# Altium PCB Tony_Tablet.PcbDoc (part 5 of 5)
Units mm, origin at the board's own origin, x right, y up, seen from the top; angles counter-clockwise.
Board outline 136.83 x 90.55 mm, 4 copper layers (Top Layer, Power, GND, Bottom Layer), stack 0.778 mm thick; 275 components, 264 nets, 1226 pads, 0 vias.
Unrouted connection lines stored in the file: 716.
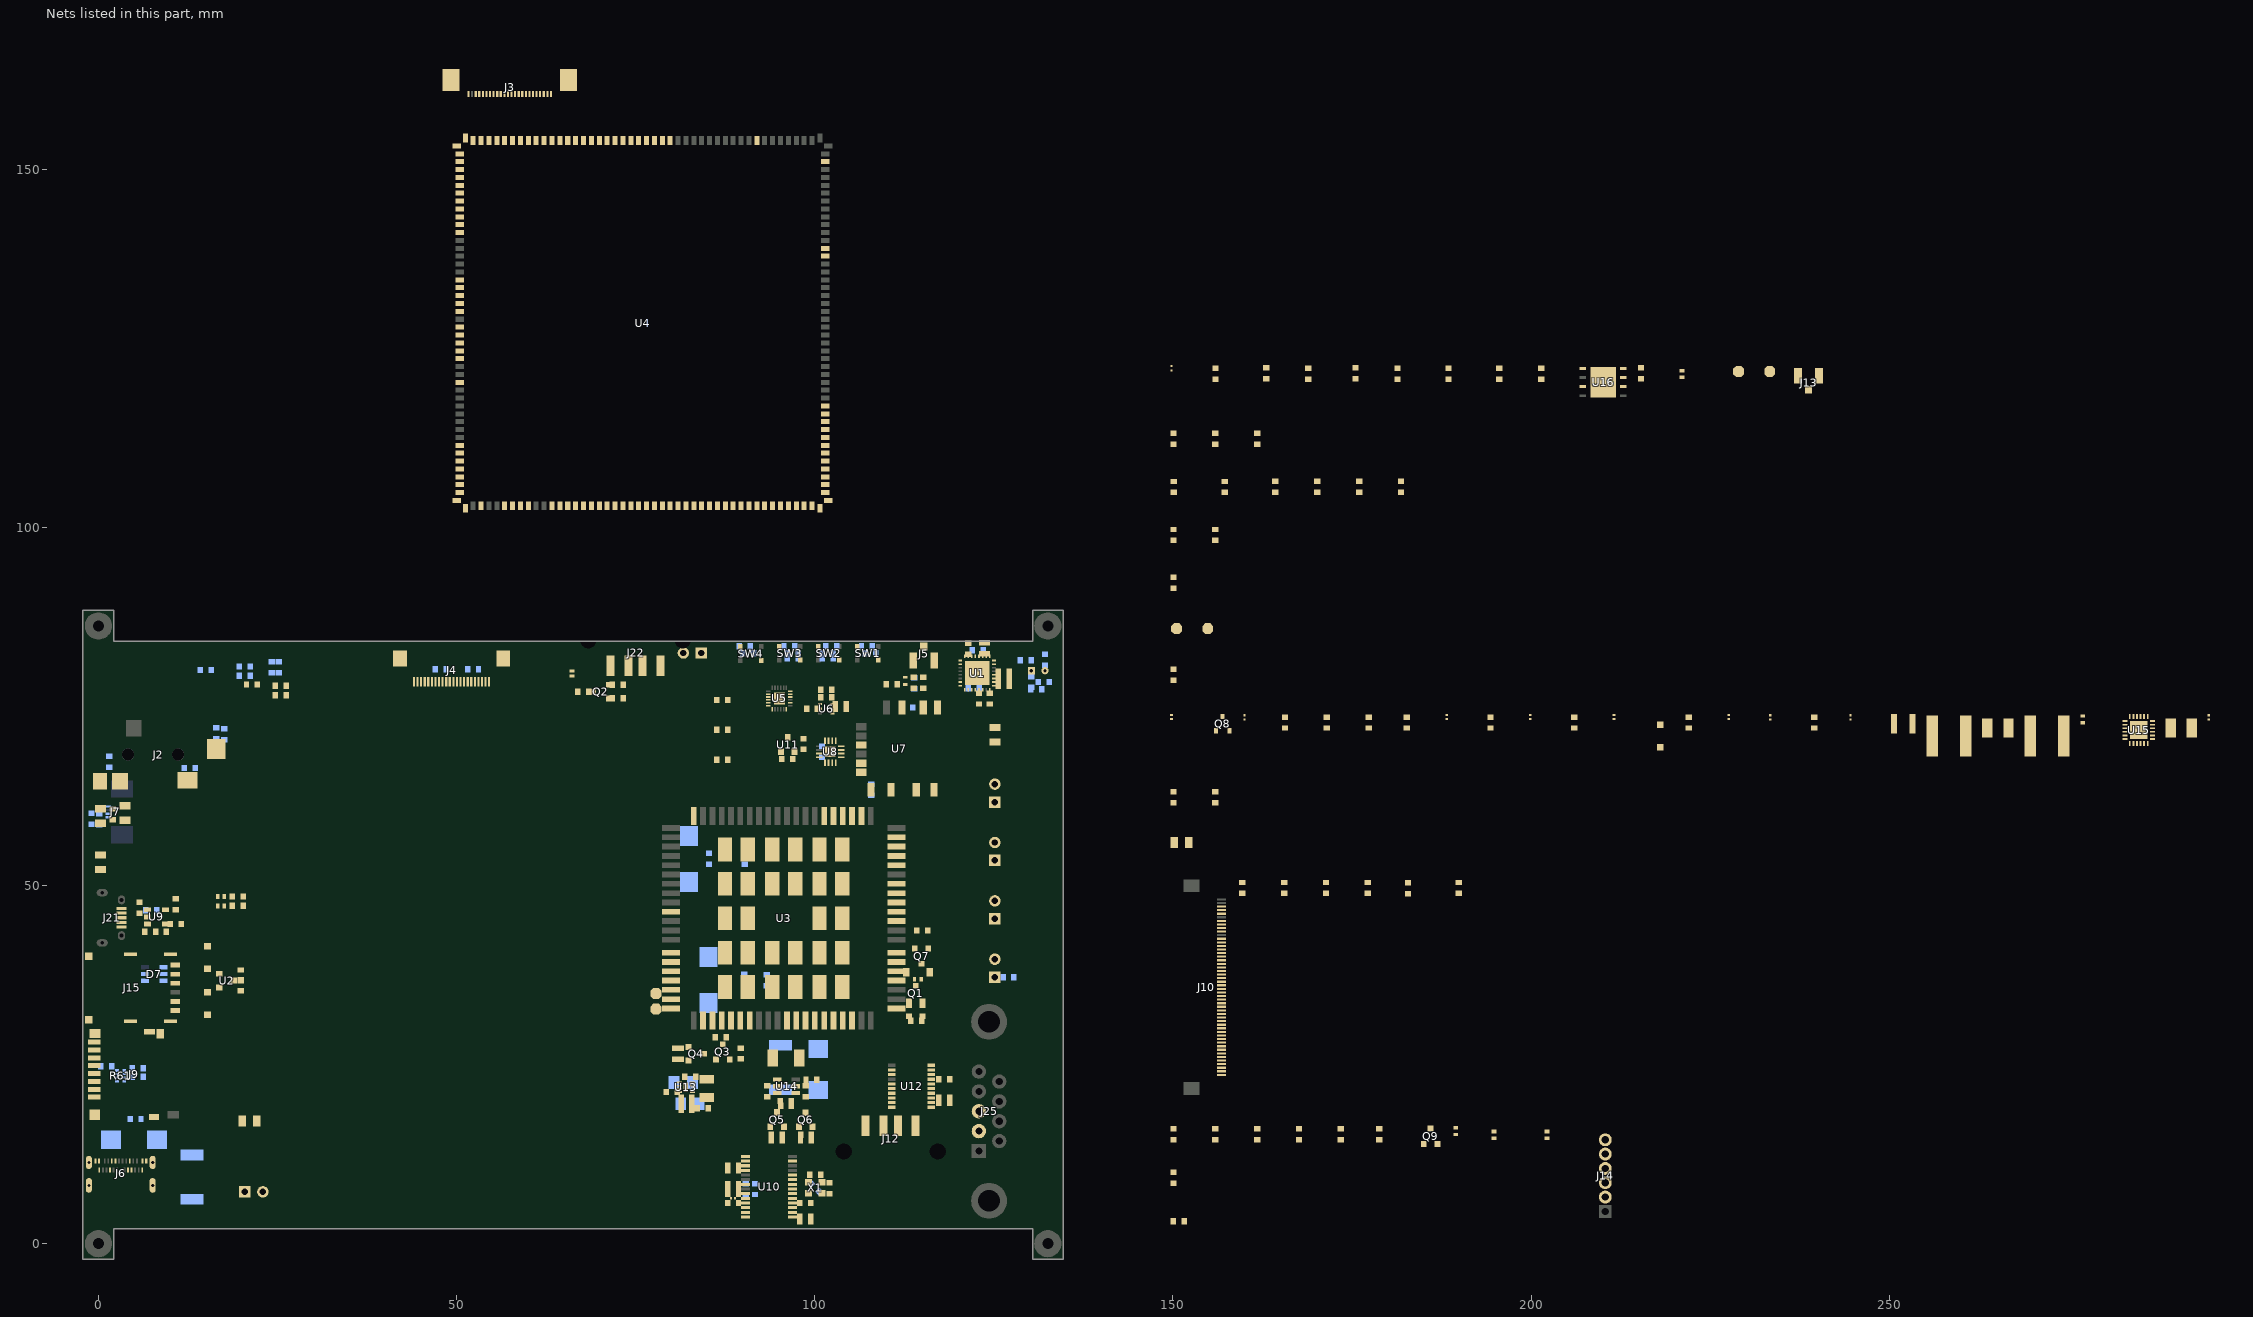
[diagram p4: the nets of this part, all layers, seen from the top]

## Part data (continued)
R59 R64 R75 R128 R130 R133: library part CRGH0603J100K, "RES SMD 100K OHM 5% 1/5W 0603", Case Code (Imperial)=0603, Case Code (Metric)=1608, Manufacturer="TE Connectivity", Max Operating Temperature=125°C, Min Operating Temperature=-55°C, Number of Resistors=1, Power Rating=200mW, Resistance=100kR, Resistance Tolerance=5%, Resistor Type="Thick Film,Power resistor", Supplier Part Number 1=A126393DKR-ND, Temperature Coefficient=100ppm/°C, Voltage Rating=50V, Case/Package=0603, ComponentLink1Description=http://www.farnell.com/datasheets/2007183.pdf?src-supplier=Element14, ComponentLink1URL=http://www.farnell.com/datasheets/2007183.pdf?src-supplier=Element14, Depth=0.8mm, ELV=Compliant, Height=0.45mm, Length=1.6mm, Manufacturer Part Number=CRGH0603J100K, Mount="Surface Mount", Number of Terminations=2, Packaging="Tape and Reel", Pricing 1="1=0.1, 10=0.049, 100=0.02, 1000=0.00899, 2500=0.0078 (USD)", REACH SVHC="No SVHC", RoHS Compliant=Yes, Series=CRGH, Stock 1=23277, Supplier 1=Digi-Key, Technology="THICK FILM", Termination=Solder, Tolerance=5%, Voltage Rating (DC)=50V, Width=0.8mm
R61: library part CAY10-473J4LF, "RES ARRAY 4 RES 47K OHM 0804", Case/Package=0804, Case Code (Metric)=2010, Manufacturer=Bourns, Max Operating Temperature=125°C, Min Operating Temperature=-55°C, Number of Resistors=4, Package Quantity=1, Power Per Element=62.5mW, Power Rating=125mW, Resistance=47kR, Resistance Tolerance=5%, Supplier Part Number 1=CAY10-473J4LFCT-ND, Temperature Coefficient=250ppm/°C, Voltage Rating=25V, Case Code (Imperial)=0804, Category="Resistor Arrays", Circuit Type=Isolated, ComponentLink1Description=https://datasheet.ciiva.com/11807/0900766b8064e463-11807137.pdf?src-supplier=RSComponents, ComponentLink1URL=https://datasheet.ciiva.com/11807/0900766b8064e463-11807137.pdf?src-supplier=RSComponents, ComponentLink2Description=https://datasheet.ciiva.com/6494/cay10-6494182.pdf?src-supplier=Digi-Key, ComponentLink2URL=https://datasheet.ciiva.com/6494/cay10-6494182.pdf?src-supplier=Digi-Key, ComponentLink3Description=https://datasheet.ciiva.com/16965/cay10-16965867.pdf?src-supplier=Avnet+Europe, ComponentLink3URL=https://datasheet.ciiva.com/16965/cay10-16965867.pdf?src-supplier=Avnet+Europe, ComponentLink4Description=https://datasheet.ciiva.com/22712/467939-22712716.pdf?src-supplier=Element14, ComponentLink4URL=https://datasheet.ciiva.com/22712/467939-22712716.pdf?src-supplier=Element14, ComponentLink5Description=https://datasheet.ciiva.com/6494/cay10-6494183.pdf?src-supplier=Digi-Key, ComponentLink5URL=https://datasheet.ciiva.com/6494/cay10-6494183.pdf?src-supplier=Digi-Key, ComponentLink6Description=https://datasheet.ciiva.com/6494/cay10-6494184.pdf?src-supplier=Digi-Key, ComponentLink6URL=https://datasheet.ciiva.com/6494/cay10-6494184.pdf?src-supplier=Digi-Key, ComponentLink7Description=https://datasheet.ciiva.com/8370/cay10-8370974.pdf?src-supplier=Avnet, ComponentLink7URL=https://datasheet.ciiva.com/8370/cay10-8370974.pdf?src-supplier=Avnet, ComponentLink8Description=https://datasheet.ciiva.com/48692/001055368-da-01-en-wid-arr-cay10-473j4lf-47k-ohm-4-w-0804-48692103.pdf?src-supplier=Conrad, ComponentLink8URL=https://datasheet.ciiva.com/48692/001055368-da-01-en-wid-arr-cay10-473j4lf-47k-ohm-4-w-0804-48692103.pdf?src-supplier=Conrad, Contact Plating=Tin, Depth=1mm, Height=0.018inch, Length=2mm, Manufacturer Part Number=CAY10-473J4LF, Military Standard=Not, Mount="Surface Mount", Number of Elements=4, Number of Pins=8, Number of Terminals/Pins=8, Packaging="Tape and Reel", Pricing 1="1=0.12000, 10=0.10400, 25=0.07200, 50=0.05600, 100=0.04000, 250=0.03120, 500=0.02480, 1000=0.01760, 5000=0.01360 (USD)", REACH SVHC="No SVHC", RoHS=Yes, RoHS Compliant=Yes, Series=CAY10, Stock 1=11037, Supplier 1=Digi-Key, Technology="THICK FILM", Terminal Pitch=0.5mm, Termination=Convex, Tolerance=5%, Voltage Rating (DC)=25V, Width=0.039inch
R63: library part RK73B1JTTD514J, "RES 510K OHM 5% 1/10W 0603", Case Code (Imperial)=0603, Case Code (Metric)=1608, Manufacturer="KOA Speer", Max Operating Temperature=155°C, Min Operating Temperature=-55°C, Package Quantity=5000, Power Rating=100mW, Resistance=510kR, Resistance Tolerance=5%, Resistor Type="Thick Film", Supplier Part Number 1=2019-RK73B1JTTD514JCT-ND, Temperature Coefficient=200ppm/°C, Voltage Rating=50V, Case/Package=0603, Category="Chip SMD Resistors", ComponentLink1Description=https://datasheet.ciiva.com/5555/rk73b-5555496.pdf?src-supplier=Mouser, ComponentLink1URL=https://datasheet.ciiva.com/5555/rk73b-5555496.pdf?src-supplier=Mouser, ComponentLink2Description=https://datasheet.ciiva.com/7763/548635-7763065.pdf?src-supplier=Element14, ComponentLink2URL=https://datasheet.ciiva.com/7763/548635-7763065.pdf?src-supplier=Element14, ComponentLink3Description=https://datasheet.ciiva.com/15202/getdatasheetpartid-423620-15202714.pdf?src-supplier=Verical, ComponentLink3URL=https://datasheet.ciiva.com/15202/getdatasheetpartid-423620-15202714.pdf?src-supplier=Verical, Construction=Rectangular, Depth=0.8mm, Height=0.45mm, Lead Free="Lead Free", Length=1.6mm, Manufacturer Part Number=RK73B1JTTD514J, Military Standard=Not, Packaging="Tape and Reel", Pricing 1="1=0.10000, 10=0.01400, 100=0.00580, 1000=0.00262, 2500=0.00228 (USD)", REACH SVHC=Unknown, RoHS=Yes, RoHS Compliant=Yes, Series=RK73B, Stock 1=50000, Supplier 1=Digi-Key, Technology="THICK FILM", Termination=SMD/SMT, Tolerance=5%, Voltage Rating (DC)=50V, Width=0.8mm
R65: library part RC0603FR-071M1L, "RES SMD 1.1M OHM 1% 1/10W 0603", Case Code (Imperial)=0603, Case Code (Metric)=1608, Manufacturer=Yageo, Max Operating Temperature=155°C, Max Power Dissipation=100mW, Min Operating Temperature=-55°C, Resistance=1.1MR, Resistor Type="Thick Film", Supplier Part Number 1=YAG3324CT-ND, Temperature Coefficient=100ppm/°C, Tolerance=1%, Voltage Rating=50V, Case/Package=0603, Category="Chip SMD Resistors", ComponentLink1Description=https://datasheet.ciiva.com/11808/0900766b80c66297-11808821.pdf?src-supplier=RSComponents, ComponentLink1URL=https://datasheet.ciiva.com/11808/0900766b80c66297-11808821.pdf?src-supplier=RSComponents, ComponentLink2Description=https://datasheet.ciiva.com/28419/pyu-rc0603-51-rohs-l-4-28419097.pdf?src-supplier=Avnet+Europe, ComponentLink2URL=https://datasheet.ciiva.com/28419/pyu-rc0603-51-rohs-l-4-28419097.pdf?src-supplier=Avnet+Europe, ComponentLink3Description=https://datasheet.ciiva.com/12560/rc0603-272842-12560493.pdf?src-supplier=Mouser, ComponentLink3URL=https://datasheet.ciiva.com/12560/rc0603-272842-12560493.pdf?src-supplier=Mouser, Construction=Rectangular, Contact Plating=Tin,Matte, Depth=0.8mm, Features="Moisture Resistant", Height=0.45mm, Lead Free="Lead Free", Length=1.6mm, Manufacturer Part Number=RC0603FR-071M1L, Military Standard=Not, Mount="Surface Mount", Number of Terminations=2, Packaging="Tape and Reel", Power Rating=100mW, Pricing 1="1=0.10000, 10=0.02400, 100=0.00970, 1000=0.00436, 2500=0.00378 (USD)", RoHS=Yes, RoHS Compliant=Yes, Series=RC, Size Code=0603, Stock 1=137699, Supplier 1=Digi-Key, Technology="THICK FILM", Termination=SMD/SMT, Width=0.031inch
R70: library part RC0201JR-0747KL, "RES SMD 47K OHM 5% 1/20W 0201", Case/Package=0201, Case Code (Metric)=0603, Manufacturer=Yageo, Max Operating Temperature=125°C, Max Power Dissipation=50mW, Min Operating Temperature=-55°C, Package Quantity=10000, Resistance=47kR, Resistance Tolerance=5%, Resistor Type="Thick Film", Supplier Part Number 1=311-47KNCT-ND, Temperature Coefficient=200ppm/°C, Voltage Rating=25V, Case Code (Imperial)=0201, Category="Chip SMD Resistors", ComponentLink1Description=https://datasheet.ciiva.com/2492/pyu-r-int-thick-7-2492966.pdf?src-supplier=Digi-Key, ComponentLink1URL=https://datasheet.ciiva.com/2492/pyu-r-int-thick-7-2492966.pdf?src-supplier=Digi-Key, ComponentLink2Description=https://datasheet.ciiva.com/5989/1563626-5989624.pdf?src-supplier=Farnell, ComponentLink2URL=https://datasheet.ciiva.com/5989/1563626-5989624.pdf?src-supplier=Farnell, ComponentLink3Description=https://datasheet.ciiva.com/28399/pyu-rc0201-51-rohs-l-8-28399338.pdf?src-supplier=Avnet+Europe, ComponentLink3URL=https://datasheet.ciiva.com/28399/pyu-rc0201-51-rohs-l-8-28399338.pdf?src-supplier=Avnet+Europe, ComponentLink4Description=https://datasheet.ciiva.com/8889/pyu-rc0201-51-rohs-l-8-8889071.pdf?src-supplier=Avnet, ComponentLink4URL=https://datasheet.ciiva.com/8889/pyu-rc0201-51-rohs-l-8-8889071.pdf?src-supplier=Avnet, ComponentLink5Description=https://datasheet.ciiva.com/2492/pyu-r-int-thick-7-2492965.pdf?src-supplier=Digi-Key, ComponentLink5URL=https://datasheet.ciiva.com/2492/pyu-r-int-thick-7-2492965.pdf?src-supplier=Digi-Key, ComponentLink6Description=https://datasheet.ciiva.com/2492/pyu-r-int-thick-7-2492967.pdf?src-supplier=Digi-Key, ComponentLink6URL=https://datasheet.ciiva.com/2492/pyu-r-int-thick-7-2492967.pdf?src-supplier=Digi-Key, ComponentLink7Description=https://datasheet.ciiva.com/16855/pyu-rc0201-51-rohs-l-8-16855517.pdf?src-supplier=Avnet+Europe, ComponentLink7URL=https://datasheet.ciiva.com/16855/pyu-rc0201-51-rohs-l-8-16855517.pdf?src-supplier=Avnet+Europe, Construction=Rectangular, Contact Plating=Tin,Matte, Depth=0.3mm, Features="Moisture Resistant", Height=0.01inch, Lead Free="Lead Free", Length=0.6mm, Manufacturer Part Number=RC0201JR-0747KL, Military Standard=Not, Number of Pins=2, Number of Terminations=2, Packaging="Tape and Reel", Power Rating=50mW, Pricing 1="1=0.10000, 10=0.02800, 100=0.01140, 1000=0.00513, 2500=0.00445, 5000=0.00368 (USD)", Radiation Hardening=No, REACH SVHC="No SVHC", RoHS=Yes, RoHS Compliant=Yes, Series=RC, Stock 1=472205, Supplier 1=Digi-Key, Technology="THICK FILM", Termination=SMD/SMT, Tolerance=5%, Voltage Rating (DC)=25V, Width=0.3mm, Working Voltage=25V
R126: library part RK73H1JTTD4023F, "RES 402K OHM 1% 1/10W 0603", Case Code (Imperial)=0603, Case Code (Metric)=1608, Manufacturer="KOA Speer", Max Operating Temperature=155°C, Min Operating Temperature=-55°C, Power Rating=100mW, Resistance=402kR, Resistor Type="Thick Film", Supplier Part Number 1=2019-RK73H1JTTD4023FCT-ND, Temperature Coefficient=100ppm/°C, Tolerance=1%, Voltage Rating=50V, Case/Package=0603, Category="Chip SMD Resistors", ComponentLink1Description=https://datasheet.ciiva.com/5553/rk73h-5553241.pdf?src-supplier=Mouser, ComponentLink1URL=https://datasheet.ciiva.com/5553/rk73h-5553241.pdf?src-supplier=Mouser, Construction=Rectangular, Depth=0.8mm, Lead Free="Lead Free", Length=1.6mm, Manufacturer Part Number=RK73H1JTTD4023F, Military Standard=Not, Packaging="Tape and Reel", Pricing 1="1=0.10000, 10=0.02200, 100=0.00910, 1000=0.00408, 2500=0.00354 (USD)", RoHS=Yes, RoHS Compliant=Yes, Series=RK73H, Stock 1=50000, Supplier 1=Digi-Key, Termination=SMD/SMT, Voltage Rating (DC)=50V
R127: library part CRCW0603270KFKEAHP, "RES SMD 270K OHM 1% 1/4W 0603", Case/Package=0603, Manufacturer="Vishay Dale", Max Operating Temperature=155°C, Max Power Dissipation=250mW, Min Operating Temperature=-55°C, Package Quantity=5000, Resistance=270kR, Resistor Type="Thick Film", Supplier Part Number 1=541-CRCW0603270KFKEAHPCT-ND, Temperature Coefficient=100ppm/°C, Tolerance=1%, Category="Chip SMD Resistors", ComponentLink1Description=https://datasheet.ciiva.com/2576/crcwhpe3-2576986.pdf?src-supplier=Digi-Key, ComponentLink1URL=https://datasheet.ciiva.com/2576/crcwhpe3-2576986.pdf?src-supplier=Digi-Key, Contact Plating=Tin, Features="Automotive AEC-Q200", Height=0.022inch, Lead Free="Lead Free", Length=0.063inch, Manufacturer Part Number=CRCW0603270KFKEAHP, Mount="Surface Mount", Number of Terminations=2, Packaging="Tape and Reel", Power Rating=250mW, Pricing 1="1=0.17000, 10=0.14800, 100=0.05790, 1000=0.02422, 2500=0.02220 (USD)", RoHS=Yes, RoHS Compliant=Yes, Series=CRCW-HP, Stock 1=1711, Supplier 1=Digi-Key, Termination=Wraparound, Width=0.033inch
R129: library part CRCW0603536KFKEA, "RES SMD 536K OHM 1% 1/10W 0603", Case Code (Imperial)=0603, Case Code (Metric)=1608, Manufacturer=Vishay, Max Operating Temperature=155°C, Max Power Dissipation=100mW, Min Operating Temperature=-55°C, Package Quantity=10, Resistance=536kR, Resistance Tolerance=1%, Resistor Type="Thick Film", Supplier Part Number 1=541-536KHDKR-ND, Temperature Coefficient=100ppm/°C, Voltage Rating=75V, Case/Package=0603, ComponentLink1Description=http://www.farnell.com/datasheets/1697337.pdf?src-supplier=Element14, ComponentLink1URL=http://www.farnell.com/datasheets/1697337.pdf?src-supplier=Element14, ComponentLink2Description=http://www.farnell.com/datasheets/2111203.pdf?src-supplier=Element14, ComponentLink2URL=http://www.farnell.com/datasheets/2111203.pdf?src-supplier=Element14, ComponentLink3Description=http://www.vishay.com/docs/20035/dcrcwe3.pdf?src-supplier=Digi-Key, ComponentLink3URL=http://www.vishay.com/docs/20035/dcrcwe3.pdf?src-supplier=Digi-Key, ComponentLink4Description=http://www.mouser.com/ds/2/427/dcrcwe3-109170.pdf?src-supplier=Mouser, ComponentLink4URL=http://www.mouser.com/ds/2/427/dcrcwe3-109170.pdf?src-supplier=Mouser, ComponentLink5Description=http://www.vishay.com/docs/20035/dcrcwe3.pdf?src-supplier=Future+Electronics, ComponentLink5URL=http://www.vishay.com/docs/20035/dcrcwe3.pdf?src-supplier=Future+Electronics, Construction=Rectangular, Contact Plating=Tin, Depth=0.85mm, Features="Automotive AEC-Q200", Height=0.45mm, Lead Free="Lead Free", Length=1.55mm, Manufacturer Part Number=CRCW0603536KFKEA, Military Standard=Not, Number of Pins=2, Number of Terminations=2, Packaging="Tape and Reel", Power Rating=100mW, Pricing 1="1=0.1, 10=0.036, 100=0.0145, 1000=0.00652, 2500=0.00566 (USD)", Radiation Hardening=No, REACH SVHC=Unknown, RoHS Compliant=Yes, Series=CRCW, Size Code=0603, Stock 1=4255, Supplier 1=Digi-Key, Technology="THICK FILM", Termination=SMD/SMT, Tolerance=1%, Voltage Rating (DC)=75V, Weight=7.1E-05oz, Width=0.033inch
SB2 SB3 SB4 SB5 SB6 SB7 SB8 SB9 SB10 SB11 SB12 SB13 SB14 SB15 SB16 SB17: "Solder Bridge ON"
SW1 SW2 SW3 SW4: "SWITCH TACTILE SPST-NO 0.05A 32V", Case/Package=SMD/SMT, Current Rating=50mA, Manufacturer="ITT C&K", Max Operating Temperature=85°C, Max Voltage Rating (DC)=32V, Min Operating Temperature=-40°C, Operating Force=1.6N, Package Quantity=5000, Power Rating=500mW, Ratings="IP68,Waterproof,Dust Tight", Supplier Part Number 1=CKN10289CT-ND, Actuator Type=Standard, Category="Tactile Switches", ComponentLink1Description=https://datasheet.ciiva.com/5684/1443640-5684448.pdf?src-supplier=Farnell, ComponentLink1URL=https://datasheet.ciiva.com/5684/1443640-5684448.pdf?src-supplier=Farnell, ComponentLink2Description=https://datasheet.ciiva.com/2900/kmt-0xx-ngj-lhs-drawing-2900147.pdf?src-supplier=Digi-Key, ComponentLink2URL=https://datasheet.ciiva.com/2900/kmt-0xx-ngj-lhs-drawing-2900147.pdf?src-supplier=Digi-Key, ComponentLink3Description=https://datasheet.ciiva.com/2900/kmt-0xx-ngj-lhs-drawing-2900148.pdf?src-supplier=Digi-Key, ComponentLink3URL=https://datasheet.ciiva.com/2900/kmt-0xx-ngj-lhs-drawing-2900148.pdf?src-supplier=Digi-Key, ComponentLink4Description=https://datasheet.ciiva.com/2900/kmt-0xx-ngj-lhs-drawing-2900149.pdf?src-supplier=Digi-Key, ComponentLink4URL=https://datasheet.ciiva.com/2900/kmt-0xx-ngj-lhs-drawing-2900149.pdf?src-supplier=Digi-Key, ComponentLink5Description=https://datasheet.ciiva.com/22712/1443640-22712102.pdf?src-supplier=Element14, ComponentLink5URL=https://datasheet.ciiva.com/22712/1443640-22712102.pdf?src-supplier=Element14, ComponentLink6Description=https://datasheet.ciiva.com/7986/1443640-7986975.pdf?src-supplier=Element14, ComponentLink6URL=https://datasheet.ciiva.com/7986/1443640-7986975.pdf?src-supplier=Element14, Contact Material=Silver, Contact Plating=Silver, Depth=3.4mm, Illumination Type=Non-Illuminated,Illuminated, Lead Free="Lead Free", Length=2.6mm, Manufacturer Part Number=KMT021NGJLHS, Max Current Rating=50mA, Mechanical Life=300000Cycles, Mount="Surface Mount", Orientation=Straight, Packaging="Tape and Reel", Pricing 1="1=0.30000, 10=0.29500, 25=0.27960, 100=0.25310, 250=0.23076, 500=0.21448, 1000=0.18297, 2500=0.17789 (USD)", Radiation Hardening=No, REACH SVHC="No SVHC", RoHS=Yes, RoHS Compliant=Yes, Series=KMT0, Stock 1=5223, Supplier 1=Digi-Key, Switch Function=Off-Mom, Switch Travel=0.15mm, Termination=J-Lead, Throw Configuration=SPST, Voltage Rating (DC)=32V
U1: "Single I2S/PCM Interface, Stereo, 2.3W Mono Amp, 45mW Headphone Amp", Manufacturer=Realtek, Manufacturer Part No=ALC5621-GR, Package=QFN-32
U2 U11: "IC REG LINEAR 1.8V 250MA SOT23-3", Manufacturer=ABLIC, Supplier Part Number 1=1662-1438-1-ND, Manufacturer Part Number=S-1206B18-M3T1U, Pricing 1="1=0.92000, 10=0.80800, 25=0.75960, 100=0.57580, 250=0.49000, 500=0.46550 (USD)", Stock 1=577, Supplier 1=Digi-Key
U3: "UMTS/HSPA+ Module", Manufacturer=Quectel, Package=Custom, Manufacturer Part No=UC200T
U4: "S5P4418 Quad Core Android SoM System on Module", Manufacturer=Samsung, Package=Custom, Manufacturer Part No=S5P4418
U5: "IMU ACCEL/GYRO/COMPI2C/SPI 24QFN", Case/Package=QFN, Manufacturer="TDK InvenSense", Max Operating Temperature=85°C, Min Operating Temperature=-40°C, Category="Inertial Measurement Units (IMUs)", ComponentLink1Description=http://www.farnell.com/datasheets/2632662.pdf?src-supplier=Farnell, ComponentLink1URL=http://www.farnell.com/datasheets/2632662.pdf?src-supplier=Farnell, ComponentLink2Description=https://www.invensense.com/wp-content/uploads/2016/06/App-Note-eMD-20x48-User-Guide.pdf?src-supplier=Avnet+Europe, ComponentLink2URL=https://www.invensense.com/wp-content/uploads/2016/06/App-Note-eMD-20x48-User-Guide.pdf?src-supplier=Avnet+Europe, ComponentLink3Description=https://www.invensense.com/wp-content/uploads/2016/06/App-Note-eMD-20x48-User-Guide.pdf?src-supplier=Digi-Key, ComponentLink3URL=https://www.invensense.com/wp-content/uploads/2016/06/App-Note-eMD-20x48-User-Guide.pdf?src-supplier=Digi-Key, ComponentLink4Description=http://www.farnell.com/datasheets/2632662.pdf?src-supplier=Element14, ComponentLink4URL=http://www.farnell.com/datasheets/2632662.pdf?src-supplier=Element14, ComponentLink5Description=https://www.invensense.com/wp-content/uploads/2016/06/App-Note-eMD-20x48-User-Guide.pdf?src-supplier=Avnet, ComponentLink5URL=https://www.invensense.com/wp-content/uploads/2016/06/App-Note-eMD-20x48-User-Guide.pdf?src-supplier=Avnet, ComponentLink6Description=https://www.invensense.com/wp-content/uploads/2016/06/App-Note-eMD-20x48-User-Guide.pdf?src-supplier=Component+Distributors+Inc., ComponentLink6URL=https://www.invensense.com/wp-content/uploads/2016/06/App-Note-eMD-20x48-User-Guide.pdf?src-supplier=Component+Distributors+Inc., Manufacturer Part Number=ICM-20948, Mount="Surface Mount", Output Type=SPI,I2C, Packaging="Tape and Reel", Pricing 1="5000=3.86240, 10000=3.80800, 20000=3.69920, 30000=3.61760, 40000=3.48160, 50000=3.40000, 500000=3.31840 (USD)", RoHS=Yes, RoHS Compliant=Yes, Sensor Type=Accelerometer,Gyroscope,Magnetometer, Supplier 1=Avnet, Supplier Part Number 1=ICM-20948
U6: "SENSOR OPT 550NM AMBIENT 6SMD", Case/Package=SMD/SMT, Manufacturer="Vishay Semiconductors", Max Operating Temperature=85°C, Min Operating Temperature=-25°C, Supplier Part Number 1=VEML6030-GS15CT-ND, Category=Sensors, ComponentLink1Description=http://www.vishay.com/docs/84366/veml6030.pdf?src-supplier=Digi-Key, ComponentLink1URL=http://www.vishay.com/docs/84366/veml6030.pdf?src-supplier=Digi-Key, Manufacturer Part Number=VEML6030-GS15, Mount="Surface Mount", Output Type=I2C, Packaging="Tape and Reel", Pricing 1="1=2.00000, 5=1.89000, 10=1.62000, 25=1.29600, 50=1.18800, 100=1.08000, 500=0.94500, 1000=0.83700, 5000=0.78300 (USD)", RoHS=Yes, RoHS Compliant=Yes, Stock 1=1250, Supplier 1=Digi-Key, Wavelength=550nm
U7: "Realtek RTL8723BU Combo Module"
U8: "NXP - PCA9534BS3,118 - I/O EXPANDER, 8BIT, 400KHZ, HVQFN-16", Frequency=400kHz, Manufacturer="NXP Semiconductors", Max Operating Temperature=85°C, Max Power Dissipation=200mW, Min Operating Temperature=-40°C, Operating Supply Voltage=5.5V, Output Current=50mA, Package Quantity=1, Supplier Part Number 1=568-8706-1-ND, Category="Interface ICs", ComponentLink1Description=https://datasheet.ciiva.com/1780/pca9534-1780006.pdf?src-supplier=Digi-Key, ComponentLink1URL=https://datasheet.ciiva.com/1780/pca9534-1780006.pdf?src-supplier=Digi-Key, ComponentLink2Description=https://datasheet.ciiva.com/1780/pca9534-1780007.pdf?src-supplier=Digi-Key, ComponentLink2URL=https://datasheet.ciiva.com/1780/pca9534-1780007.pdf?src-supplier=Digi-Key, ComponentLink3Description=https://datasheet.ciiva.com/1780/pca9534-1780008.pdf?src-supplier=Digi-Key, ComponentLink3URL=https://datasheet.ciiva.com/1780/pca9534-1780008.pdf?src-supplier=Digi-Key, Interface=I2C,SMBus,Serial, Lead Free="Lead Free", Manufacturer Part Number=PCA9534BS3,118, Max Frequency=400kHz, Mount="Surface Mount", Number of I/Os=8, Number of Pins=16, Packaging="Tape and Reel", Pricing 1="1=1.61000, 10=1.48200 (USD)", RoHS=Yes, RoHS Compliant=Yes, Series=-, Stock 1=1204, Supplier 1=Digi-Key
U9: "SOT-23-5 PMIC - Power Distribution Switches RoHS", Manufacturer="Silergy Corp", Package=SOT-23-5, Manufacturer Part No=SY6280AAC
U10: "USB 2.0 Hub Controller"
U12: "IC TRANSCEIVER FULL 2/2 20TSSOP", Manufacturer=MaxLinear, Supplier Part Number 1=1016-1794-1-ND, Category="Interface ICs", Manufacturer Part Number=SP3222EEY-L/TR, Pricing 1="1=1.75000, 10=1.57600, 25=1.48680, 100=1.26660, 250=1.18932, 500=1.04066, 1000=0.86226 (USD)", RoHS=Yes, RoHS Compliant=Yes, Stock 1=1669, Supplier 1=Digi-Key
U13: Manufacturer=ZUCZUG, Package=QFN-8, Manufacturer Part No=ETA3451D2I-T
U14: "IC REG BOOST ADJ 2.7A TSOT23-6", Case/Package=SOT-23-6, Manufacturer="Monolithic Power Systems", Max Input Voltage=6V, Max Operating Temperature=125°C, Max Output Current=2.7A, Min Input Voltage=2.5V, Min Operating Temperature=-40°C, Min Output Voltage=3V, Operating Supply Current=270uA, Package Quantity=3000, Supplier Part Number 1=1589-1909-1-ND, Switching Frequency=1.2MHz, Category="Voltage Regulators - Switching", ComponentLink1Description=http://www.mouser.com/ds/2/277/MP3221_r1.0-371792.pdf?src-supplier=Mouser, ComponentLink1URL=http://www.mouser.com/ds/2/277/MP3221_r1.0-371792.pdf?src-supplier=Mouser, ComponentLink2Description=https://www.monolithicpower.com/Lists/Product_NonSynchronous%20Switcher_5745/DispForm.aspx?ID=24&src-supplier=Avnet, ComponentLink2URL=https://www.monolithicpower.com/Lists/Product_NonSynchronous%20Switcher_5745/DispForm.aspx?ID=24&src-supplier=Avnet, ComponentLink3Description=https://www.monolithicpower.com/Lists/Product_NonSynchronous%20Switcher_5745/DispForm.aspx?ID=24&src-supplier=Avnet+Asia, ComponentLink3URL=https://www.monolithicpower.com/Lists/Product_NonSynchronous%20Switcher_5745/DispForm.aspx?ID=24&src-supplier=Avnet+Asia, ComponentLink4Description=http://www.monolithicpower.com/DesktopModules/DocumentManage/API/Document/getDocument?id=891&src-supplier=Digi-Key, ComponentLink4URL=http://www.monolithicpower.com/DesktopModules/DocumentManage/API/Document/getDocument?id=891&src-supplier=Digi-Key, Lead Free="Lead Free", Manufacturer Part Number=MP3221GJ-Z, Max Output Voltage=6V, Min Supply Voltage=2.5V, Mount="Surface Mount", Number of Outputs=1, Number of Pins=6, Operating Supply Voltage=6V, Output Configuration=Positive, Output Current=2.7A, Output Type=Adjustable, Output Voltage=6V, Packaging="Tape and Reel", Pricing 1="1=1.97000, 10=1.77000, 25=1.66960, 100=1.33560, 250=1.16864, 500=1.13526, 1000=0.90153 (USD)", Radiation Hardening=No, RoHS=Yes, RoHS Compliant=Yes, Stock 1=2434, Supplier 1=Digi-Key, Synchronous Rectifier=No, Topology=Boost
U15: "IC REG SW QUAD TFT LCD 24-QFN", Case/Package=QFN, Frequency=1.2MHz, Manufacturer="Analog Devices / Linear Technology", Max Input Voltage=16V, Max Operating Temperature=85°C, Max Output Current=4A, Max Output Voltage=1.2V, Min Input Voltage=2.6V, Min Operating Temperature=-40°C, Min Output Voltage=1.25V, Output Current=750mA, Output Voltage=36V, Package Quantity=91, Supplier Part Number 1=LT1942EUF#PBF-ND, Category="Voltage Regulators - Switching", ComponentLink1Description=https://datasheet.ciiva.com/4118/41364810s7494468n7433-4118973.pdf?src-supplier=Arrow+Electronics, ComponentLink1URL=https://datasheet.ciiva.com/4118/41364810s7494468n7433-4118973.pdf?src-supplier=Arrow+Electronics, ComponentLink2Description=https://datasheet.ciiva.com/25627/0900766b810ed99d-25627392.pdf?src-supplier=RSComponents, ComponentLink2URL=https://datasheet.ciiva.com/25627/0900766b810ed99d-25627392.pdf?src-supplier=RSComponents, ComponentLink3Description=https://datasheet.ciiva.com/6188/1717046-6188033.pdf?src-supplier=Farnell, ComponentLink3URL=https://datasheet.ciiva.com/6188/1717046-6188033.pdf?src-supplier=Farnell, ComponentLink4Description=https://datasheet.ciiva.com/26910/lt1942euf-pbf-26910561.pdf?src-supplier=IIIC, ComponentLink4URL=https://datasheet.ciiva.com/26910/lt1942euf-pbf-26910561.pdf?src-supplier=IIIC, ComponentLink5Description=https://datasheet.ciiva.com/22651/1717046-22651735.pdf?src-supplier=Element14, ComponentLink5URL=https://datasheet.ciiva.com/22651/1717046-22651735.pdf?src-supplier=Element14, ComponentLink6Description=https://datasheet.ciiva.com/7312/1717046-7312028.pdf?src-supplier=Newark, ComponentLink6URL=https://datasheet.ciiva.com/7312/1717046-7312028.pdf?src-supplier=Newark, Height=0.7mm, Lead Free="Lead Free", Length=4mm, Manufacturer Part Number=LT1942EUF#PBF, Max Supply Voltage=16V, Min Supply Voltage=2.6V, Mount="Surface Mount", Number of Outputs=4, Number of Pins=24, Output Type=Adjustable, Packaging=Rail/Tube, Pricing 1="1=6.58000, 10=5.94800, 25=5.67160, 100=4.92450, 250=4.70320, 500=4.30650 (USD)", REACH SVHC="No SVHC", RoHS=Yes, RoHS Compliant=Yes, Series=-, Stock 1=235, Supplier 1=Digi-Key, Switching Frequency=1.2MHz, Termination=SMD/SMT, Width=4mm
U16: "GSMA ESIM SYSTEM-ON-CHIP FOR SEC", Manufacturer=STMicroelectronics, Supplier Part Number 1=497-ST4SI2M0020TPIFWCT-ND, Category="Integrated Circuits (ICs)", Manufacturer Part Number=ST4SI2M0020TPIFW, Pricing 1="1=5.72000, 10=5.14100, 25=4.86000, 100=4.21200, 250=3.99600, 500=3.58560 (USD)", RoHS=No, Stock 1=10, Supplier 1=Digi-Key
X1: "CRYSTAL 12.0000MHZ 18PF SMD", Case/Package=SMD/SMT, ESR (Equivalent Series Resistance)=150R, Frequency=12MHz, Frequency Stability=30ppm, Load Capacitance=18pF, Manufacturer=TXC, Max Operating Temperature=70°C, Min Operating Temperature=-20°C, Package Quantity=1, Supplier Part Number 1=717-8Z-12.000MAAJ-T, Category=Crystals, ComponentLink1Description=https://datasheet.ciiva.com/28498/1838674-28498900.pdf?src-supplier=Element14, ComponentLink1URL=https://datasheet.ciiva.com/28498/1838674-28498900.pdf?src-supplier=Element14, ComponentLink2Description=https://datasheet.ciiva.com/4950/8z-12784-4950167.pdf?src-supplier=Mouser, ComponentLink2URL=https://datasheet.ciiva.com/4950/8z-12784-4950167.pdf?src-supplier=Mouser, ComponentLink3Description=https://datasheet.ciiva.com/859/8z-859073.pdf?src-supplier=Digi-Key, ComponentLink3URL=https://datasheet.ciiva.com/859/8z-859073.pdf?src-supplier=Digi-Key, ComponentLink4Description=https://datasheet.ciiva.com/859/8z-859071.pdf?src-supplier=Digi-Key, ComponentLink4URL=https://datasheet.ciiva.com/859/8z-859071.pdf?src-supplier=Digi-Key, ComponentLink5Description=https://datasheet.ciiva.com/859/8z-859072.pdf?src-supplier=Digi-Key, ComponentLink5URL=https://datasheet.ciiva.com/859/8z-859072.pdf?src-supplier=Digi-Key, ComponentLink6Description=https://datasheet.ciiva.com/8047/1041872-8047871.pdf?src-supplier=Element14, ComponentLink6URL=https://datasheet.ciiva.com/8047/1041872-8047871.pdf?src-supplier=Element14, Depth=2mm, Frequency Tolerance=30ppm, Height=0.022inch, Length=2.5mm, Manufacturer Part Number=8Z-12.000MAAJ-T, Mount="Surface Mount", Number of Pins=4, Packaging="Tape and Reel", Pricing 1="1=1.41000, 10=1.36000, 50=1.33000, 100=1.13000, 1000=0.93000, 10000=0.78000 (USD)", REACH SVHC="No SVHC", RoHS=Yes, RoHS Compliant=Yes, Series=8Z, Stock 1=33, Supplier 1=Mouser, Termination=SMD/SMT, Tolerance=30ppm, Width=0.079inch

## Free pads (board coordinates)
  round 3.81 hole 1.524 square: MH1(0,86.233) MH2(132.537,86.233) MH3(132.537,0) MH4(0,0)

## Nets (pads, with @x,y where several pads share a name; then routed paths per layer and width w, separated by ;. In a path a pad name is that pad's centre, name@x,y a point inside that pad or via, vN(x,y) a via of type N, cw(c..) or ccw(c..) an arc to the next point about the centre after c; other vN are vias at no path point)
3G_MOD.GPIOA28: R19.2 U4.166
3G_MOD.GPIOB8: R17.2 U4.163
3G_MOD.GPIOB9: R18.2 U4.164
3G_MOD.GPIOC7: R16.2 U4.162
232RXD1: J19.1 U12.16
232TXD1: J18.2 U12.17
!DTR: J14.4 U3.66
!RTS: J14.5 U3.65
!RXD: J14.2 U3.68
!TXD: J14.3 U3.67
ANT_M: J13.1 U3.49
BAT: D2.1 J26.1
CAM1_IO0: J4.17 U8.5
CAM1_IO1: J4.18 U8.7
CAM_1.8V: C31.1 C32.1 J3.11 R24.2 U4.59
CAM_2.8V: C29.1 C30.1 J3.4 U4.58
CAM_CLK: J3.17 U4.130
CAM_D0: J3.19 U4.131
CAM_D1: J3.21 U4.132
CAM_D2: J3.22 U4.133
CAM_D3: J3.20 U4.134
CAM_D4: J3.18 U4.135
CAM_D5: J3.16 U4.136
CAM_D6: J3.14 U4.137
CAM_D7: J3.12 U4.138
CAM_H: J3.9 U4.128
CAM_PD: J3.8 U4.139
CAM_PN: J3.24 R27.2 U4.141
CAM_RST: J3.6 U4.140
CAM_SIG.CAM_V: J3.7 U4.129
D2: C48.2 L2.1 U15.23
D3: C70.1 R21.2 U15.3
DBG_RXD: J23.1 P1.1 U3.11
DBG_TXD: J23.2 P2.1 U3.12
DC5V_OTG: C58.1 C59.1 J21.1 U4.17 U9.1
DC_IN: C42.1 C50.1 D6.1 J6.A4 J6.A9 J6.B4 J6.B9
DCIN: U4.55 U4.56
ELDO3: C16.1 C17.1
EXP_INT: U4.165 U8.11
FB: C86.2 R126.1 R127.1 U13.4
FB1: C68.2 R28.1 R29.2 U15.14
FB2: R22.1 R36.2 U15.6
FB3: R21.1 R37.2 U15.5
FB4: R41.2 U15.15
GATE1: C40.1 Q5.3 Q6.1 R133.1
GND: C1.2 C2.2 C3.2 C4.2 C5.2 C6.2 C7.2 C8.1 C9.2 C10.1 C13.2 C14.2 C15.1 C16.2 C17.2 C18.2 C19.2 C20.2 C21.2 C22.2 C23.2 C24.2 C25.2 C26.2 C27.2 C28.2 C29.2 C30.2 C31.2 C32.2 C33.1 C34.1 C35.2 C36.2 C37.1 C38.1 C39.1 C41.2 C42.2 C43.2 C44.1 C45.1 C46.2 C47.2 C49.2 C50.2 C51.2 C52.2 C53.2 C54.2 C55.2 C56.1 C57.2 C58.2 C59.2 C60.2 C61.2 C62.2 C63.2 C64.2 C65.1 C66.2 C67.1 C69.2 C70.2 C71.1 C72.2 C73.2 C76.2 C77.2 C79.2 C80.2 C82.1 C84.2 C85.2 C87.2 C88.2 C89.2 C90.2 C91.2 CF1.2 D3.1 D4.2 D6.2 D7.2 J1.2 J2.1 J3.2 J3.15 J3.MP1 J3.MP2 J4.1 J4.4 J4.7 J4.10 J4.13 J4.16 J4.19 J4.MP1 J4.MP2 J5.2 J5.3 J6.A1 J6.A12 J6.B1 J6.B12 J6.G1 J6.G2 J6.S1 J6.S2 J6.S3 J6.S4 J7.1 J8.2 J9.6 J9.MP1 J9.MP2 J9.MP3 J9.MP4 J10.5 J10.36 J10.39 J10.48 J11.2 J12.4 J12.MH1 J12.MH2 J13.2 J13.3 J14.6 J15.MP1 J15.MP2 J15.MP3 J15.MP4 J15.MP5 J15.MP6 J17.2 J19.2 J21.5 J22.4 J22.MH1 J22.MH2 J26.2 P6.1 Q1.2 Q2.2 Q3.2 Q4.2 Q5.2 Q7.2 Q9.2 R3.2 R7.1 R14.2 R23.1 R29.1 R36.1 R37.1 R41.1 R45.2 R46.2 R47.1 R48.1 R49.2 R50.2 R51.2 R57.2 R59.2 R62.1 R67.2 R69.2 R70.1 R71.2 R72.2 R73.2 R127.2 R130.1 R132.2 SW1.1 SW2.1 SW3.1 SW4.1 U1.12 U1.24 U1.28 U1.33 U2.2 U3.8 U3.9 U3.19 U3.22 U3.36 U3.46 U3.48 U3.50 U3.51 U3.52 U3.53 U3.54 U3.56 U3.72 U3.85 U3.86 U3.87 U3.88 U3.89 U3.90 U3.91 U3.92 U3.93 U3.94 U3.95 U3.96 U3.97 U3.98 U3.99 U3.100 U3.101 U3.102 U3.103 U3.104 U3.105 U3.106 U3.107 U3.108 U3.109 U3.110 U3.111 U3.112 U4.51 U4.52 U4.90 U4.101 U4.184 U5.9 U5.11 U5.18 U5.20 U5.25 U6.1 U6.4 U7.4 U7.5 U8.1 U8.6 U8.15 U8.16 U8.17 U9.2 U10.15 U11.2 U12.1 U12.18 U13.2 U13.3 U13.9 U14.2 U15.1 U15.10 U15.21 U15.25 X1.2 X1.4
GSM_DM: SB16.1 U3.70 U10.27
GSM_DP: SB17.1 U3.69 U10.28
HP_OUT_L: C11.1 U1.30
HP_OUT_R: C12.1 U1.29
HUB_D3.HUB_DM3: U7.2 U10.8
HUB_D3.HUB_DP3: U7.3 U10.9
HUB_DM2: J12.2 U10.2
HUB_DP2: J12.3 U10.3
IMU_INT: U5.12 U8.8
LCD_AVDD: J10.43 Q8.3
LCD_AVDD#: C68.1 C69.1 D5.1 Q8.2 R28.2 R42.2
LCD_B0: J10.19 R69.1 U4.35
LCD_B1: J10.18 R71.1 U4.36
LCD_B2: J10.17 R72.1 U4.37
LCD_B3: J10.16 R10.1 U4.38
LCD_B4: J10.15 R12.1 U4.39
LCD_B5: J10.14 R20.1 U4.40
LCD_B6: J10.13 R73.1 U4.41
LCD_B7: J10.12 R68.1 U4.42
LCD_CLK: J10.37 U4.46
LCD_DE: J10.9 U4.43
LCD_G0: J10.27 U4.27
LCD_G1: J10.26 U4.28
LCD_G2: J10.25 U4.29
LCD_G3: J10.24 U4.30
LCD_G4: J10.23 U4.31
LCD_G5: J10.22 U4.32
LCD_G6: J10.21 U4.33
LCD_G7: J10.20 U4.34
LCD_HSYNC: J10.11 U4.44
LCD_R0: J10.35 U4.19
LCD_R1: J10.34 U4.20
LCD_R2: J10.33 U4.21
LCD_R3: J10.32 U4.22
LCD_R4: J10.31 U4.23
LCD_R5: J10.30 U4.24
LCD_R6: J10.29 U4.25
LCD_R7: J10.28 U4.26
LCD_SIG.LCD_VSYNC: J10.10 U4.45
LVDS_VDD: C5.1 C6.1 C89.1 J18.1 L6.2 Q6.3 R128.2 U1.26 U14.5
MCU_CAM1_MCLK: J3.13 U4.142
MCU_HP_DET: R9.2 U4.127
MCU_I2C.MCU_SCL_0: J4.20 R4.1 R25.2 U4.78
MCU_I2C.MCU_SDA_0: J4.21 R5.1 R26.2 U4.79
MCU_I2S.MCU_I2S_BCK: U1.8 U4.123
MCU_I2S.MCU_I2S_LRCK: U1.7 U4.126
MCU_I2S.MCU_I2S_MCLK: U1.11 U4.122
MCU_I2S.MCU_I2S_SDIN: U1.9 U4.124
MCU_I2S.MCU_I2S_SDOUT: U1.10 U4.125
MCU_KEY.MCU_KEY_VOLDN: R34.2 U4.156
MCU_KEY.MCU_KEY_VOLUP: R32.2 U4.157
MCU_KEY.MCU_PWR_KEY: C34.2 R35.2 U4.160
MCU_KEY.MCU_RESETIN: R30.2 U4.159
MCU_OTG_PWRON: R58.2 U4.14
MCU_PWREN_SYS: U4.57 U13.1
MCU_SCL_1: U4.9
MCU_SCL_2: R40.1 U4.7 U5.23 U6.5 U8.12
MCU_SD0.MCU_SD0_CD: "J9.*CD Switch" U4.177
MCU_SD0.MCU_SD0_CLK: R56.1 U4.183
MCU_SD0.MCU_SD0_CMD: J9.3 U4.182
MCU_SD0.MCU_SD0_D0: J9.7 R61.8 U4.181
MCU_SD0.MCU_SD0_D1: J9.8 R61.7 U4.180
MCU_SD0.MCU_SD0_D2: J9.1 R61.6 U4.179
MCU_SD0.MCU_SD0_D3: J9.2 R61.5 U4.178
MCU_SDA_1: U4.8
MCU_SDA_2: R38.1 U4.6 U5.24 U6.2 U8.13
MCU_SEN0_INT: R77.1 U4.158
MCU_TOUCH_INT: U4.3
MCU_USB+: J21.3 U4.16
MCU_USB-: J21.2 J21.4 U4.15 U4.18
MCU_USB_HOST.MCU_USB_HOST_D+: U4.13 U10.26
MCU_USB_HOST.MCU_USB_HOST_D-: U4.12 U10.25
MIC1N: MK1.2 R3.1 U1.2
MIC1P: C2.1 MK1.1 R1.1 U1.1
MICBIAS: R2.1 U1.32
MICBIAS#: C1.1 R1.2 R2.2
MIPICSI.MIPICSI_DN0: J4.2 U4.118
MIPICSI.MIPICSI_DN1: J4.5 U4.116
MIPICSI.MIPICSI_DN2: J4.11 U4.114
MIPICSI.MIPICSI_DN3: J4.14 U4.112
MIPICSI.MIPICSI_DNCLK: J4.8 U4.120
MIPICSI.MIPICSI_DP0: J4.3 U4.119
MIPICSI.MIPICSI_DP1: J4.6 U4.117
MIPICSI.MIPICSI_DP2: J4.12 U4.115
MIPICSI.MIPICSI_DP3: J4.15 U4.113
MIPICSI.MIPICSI_DPCLK: J4.9 U4.121
NetC7_1: C7.1 C9.1 U1.27
NetC8_2: C8.2 U1.19
NetC10_2: C10.2 U1.20
NetC11_2: C11.2 J2.5 R9.1
NetC12_2: C12.2 J2.4
NetC19_1: C19.1 L1.1 SB6.2
NetC20_1: C20.1 U7.7
NetC33_2: C33.2 R30.1 SW1.3
NetC37_2: C37.2 U5.10
NetC38_2: C38.2 C39.2 R39.1 U6.6
NetC43_1: C43.1 L1.2
NetC44_2: C44.2 R31.1 R32.1 SW2.3
NetC45_2: C45.2 R33.1 R34.1 SW3.3
NetC56_2: C56.2 U15.11
NetC60_1: C60.1 R60.2 R70.2 U10.13
NetC67_2: C67.2 U15.12
NetC71_2: C71.2 U15.9
NetC74_1: C74.1 C75.1 R53.2 SB11.2
NetC78_1: C78.1 U12.4
NetC78_2: C78.2 U12.2
NetC79_1: C79.1 U12.3
NetC80_1: C80.1 U12.7
NetC81_1: C81.1 U12.6
NetC81_2: C81.2 U12.5
NetD12_2: D12.2 L6.1 U14.1
NetJ2_2: J2.2 R8.1
NetJ3_1: J3.1 R27.1
NetJ3_3: J3.3 R26.1
NetJ3_5: J3.5 R25.1
NetJ3_10: J3.10 R24.1
NetJ5_1: J5.1 SB5.1
NetJ6_A5: J6.A5 R47.2
NetJ6_B5: J6.B5 R48.2
NetJ7_4: J7.4 SB2.2
NetJ8_1: J8.1 SB3.2
NetJ9_5: J9.5 R56.2
NetJ10_8: J10.8 R74.1
NetJ10_44: J10.44 R75.1
NetJ10_47: J10.47 R76.1
NetJ22_2: J22.2 SB16.2
NetJ22_3: J22.3 SB17.2
NetL5_1: L5.1 U13.7
NetL5_2: L5.2 SB4.1
NetL7_1: L7.1 U15.2
NetLED1_2: LED1.2 R11.2
NetLED2_2: LED2.2 R15.2
NetLED3_2: LED3.2 R44.2
NetLED4_2: LED4.2 R23.2
NetLED5_2: LED5.2 R77.2
NETMODE_: R13.2 U3.5
NetQ1_1: Q1.1 R13.1 R14.1
NetQ1_3: Q1.3 R11.1
NetQ2_1: Q2.1 R16.1 R45.1
NetQ3_1: Q3.1 R43.1 R51.1
NetQ3_3: Q3.3 R15.1
NetQ4_1: Q4.1 R17.1 R46.1
NetQ5_1: Q5.1 R131.1 R132.1
NetQ7_1: Q7.1 R18.1 R49.1
NetQ9_1: Q9.1 R19.1 R50.1
NetR4_2: R4.2 U1.16
NetR5_2: R5.2 U1.17
NetR6_1: R6.1 U1.31
NetR7_2: R7.2 U1.18
NetR35_1: R35.1 SW4.3
NetR52_2: R52.2 SB9.2
NetR53_1: R53.1 SB12.1
NetR54_2: R54.2 U12.8
NetR55_1: R55.1 U12.9
NetR57_1: R57.1 U9.3
NetR58_1: R58.1 R59.1 U9.4
NetR62_2: R62.2 U10.4
NetR63_1: R63.1 U10.17
NetR64_1: R64.1 U10.18
NetR66_1: R66.1 R67.1 U10.21
NetR128_1: R128.1 U14.4
NetR129_2: R129.2 R130.2 U14.3
NetSB7_2: SB7.2 U16.8
NetSB8_1: SB8.1 U16.3
NetSB10_1: SB10.1 U16.1 U16.9
NetSB13_2: SB13.2 U16.6
NetSB14_2: SB14.2 U16.7
NETSTATUS_: R43.2 U3.6
PC_RXD1: J25.3 R55.2
PC_TXD1: J25.2 R54.1
PGOOD: Q8.1 R42.1 U15.13
PWRKEY: Q7.3 U3.21
RESET_N: Q4.3 U3.20
RF: SB5.2 SB6.1 U7.6
SPKR_LN: J11.1 U1.25
SPKR_LP: J1.1 U1.23
STATUS_: R44.1 U3.61
SUSPEND: U7.14 U8.4
SW1: D5.2 L3.1 U15.20
SW2: C48.1 L4.1 U15.24
SW4: L8.1 U15.19
SYNC: U7.11 U8.2
UART_SIG.UARTRXD0: U4.149 U12.10
UART_SIG.UARTRXD1: U4.147 U12.15
UART_SIG.UARTRXD3: J16.2 U4.143
UART_SIG.UARTTXD0: U4.150 U12.12
UART_SIG.UARTTXD1: U4.148 U12.13
UART_SIG.UARTTXD3: J17.1 U4.144
UARTRXD2: J20.1 P4.1 U4.145
UARTTXD2: J20.2 P5.1 U4.146
USB_BOOT: D4.1 R52.1 U3.115
USIM_CLK: D7.5 J15.C3 SB13.1 U3.16
USIM_DATA: D7.4 J15.C7 SB8.2 SB12.2 U3.15
USIM_GND: C74.2 C75.2 J15.C5 SB10.2 U3.10
USIM_RST: D7.6 J15.C2 SB14.1 U3.17
USIM_VDD: D7.1 J15.C1 SB7.1 SB11.1 U3.14
V33_HUB: C63.1 C64.1 R64.2 U10.1 U10.5 U10.10 U10.16 U10.24
VBAT: C14.1 C21.1 C22.1 C23.1 C24.1 C25.1 C26.1 C27.1 C49.1 C51.1 D3.2 J7.3 LED1.1 LED2.1 LED3.1 SB2.1 SB3.1 U3.57 U3.58 U3.59 U3.60 U4.49 U4.50
VBAT_SYS: C40.2 C84.1 C85.1 D1.1 Q6.2 R133.2 U4.53 U4.54 U13.8
VBAT_SYS#: C13.1 D1.2 D2.2 U2.1
VBAT_USB: C57.1 C61.1 C62.1 C90.1 C91.1 D12.1 J12.1 R60.1 R63.2 R66.2 R129.1 U9.5 U10.23
VCC1P0_CORE_DC: C86.1 C87.1 C88.1 R126.2 SB4.2 U4.47 U4.48 U13.5
VCC3P3_SYS: C3.1 C4.1 C28.1 C35.1 C41.1 C47.1 C52.1 C53.1 C54.1 C55.1 C77.1 J4.22 J9.4 J10.7 J10.38 J16.1 L3.2 L4.2 L7.2 L8.2 LED4.1 LED5.1 R6.2 R8.2 R10.2 R12.2 R20.2 R31.2 R33.2 R38.2 R39.2 R40.2 R61.1 R61.2 R61.3 R61.4 R68.2 R74.2 R75.2 R76.2 R131.2 SB15.2 U1.13 U1.14 U4.1 U7.1 U8.14 U11.1 U12.19 U12.20 U15.7 U15.8 U15.22
"VCC 1P8_LDO": C18.1 C36.1 C76.1 U5.8 U5.13 U5.22 U11.3
"VCC 1P8_RTC": C66.1 U2.3 U4.169
VCOM: C46.1 J10.6 J10.46 SB15.1
VDD_EXT: P3.1 SB9.1 U3.7
VGH: J10.41 U15.4
VGL: C73.1 J10.42 L2.2 R22.2
VLED_N: J10.3 U15.17
VLED_N2: J10.4 U15.18
VLED_P: C72.1 J10.1 J10.2 U15.16
VUSB_GSM: J22.1 U3.71
W_DISABLE: C15.2 Q9.3 U3.4
WAKEUP: CF1.1 Q2.3 U3.1
WOW: U7.13 U8.3
XTAL1: C82.2 R65.1 U10.6 X1.1
XTAL2: C65.2 R65.2 U10.7 X1.3
pads on no net: "J9.#CD Switch" D7.3 J2. J2.3 J3.23 J6.A2 J6.A3 J6.A6 J6.A7 J6.A8 J6.A10 J6.A11 J6.B2 J6.B3 J6.B6 J6.B7 J6.B8 J6.B10 J6.B11 J7.2 J7.MP1 J7.MP2 J10.40 J10.45 J10.49 J10.50 J10.51 J10.52 J14.1 J15.C6 J21.MH1 J21.MH2 J21.MH3 J21.MH4 J25.1 J25.4 J25.5 J25.6 J25.7 J25.8 J25.9 J25.MH1 J25.MH2 SW1.2 SW1.4 SW2.2 SW2.4 SW3.2 SW3.4 SW4.2 SW4.4 U1.3 U1.4 U1.5 U1.6 U1.15 U1.21 U1.22 U3.2 U3.3 U3.13 U3.18 U3.23 U3.24 U3.25 U3.26 U3.27 U3.28 U3.29 U3.30 U3.31 U3.32 U3.33 U3.34 U3.35 U3.37 U3.38 U3.39 U3.40 U3.41 U3.42 U3.43 U3.44 U3.45 U3.47 U3.55 U3.62 U3.63 U3.64 U3.113 U3.114 U3.116 U3.141 U3.142 U3.143 U3.144 U4.2 U4.4 U4.5 U4.10 U4.11 U4.60 U4.61 U4.62 U4.63 U4.64 U4.65 U4.66 U4.67 U4.68 U4.69 U4.70 U4.71 U4.72 U4.73 U4.74 U4.75 U4.76 U4.77 U4.80 U4.81 U4.82 U4.83 U4.84 U4.85 U4.86 U4.87 U4.88 U4.89 U4.91 U4.92 U4.93 U4.94 U4.95 U4.96 U4.97 U4.98 U4.99 U4.100 U4.102 U4.103 U4.104 U4.105 U4.106 U4.107 U4.108 U4.109 U4.110 U4.111 U4.151 U4.152 U4.153 U4.154 U4.155 U4.161 U4.167 U4.168 U4.170 U4.171 U4.172 U4.173 U4.174 U4.175 U4.176 U5.1 U5.2 U5.3 U5.4 U5.5 U5.6 U5.7 U5.14 U5.15 U5.16 U5.17 U5.19 U5.21 U6.3 U7.8 U7.9 U7.10 U7.12 U8.9 U8.10 U10.11 U10.12 U10.14 U10.19 U10.20 U10.22 U12.11 U12.14 U13.6 U14.6 U16.2 U16.4 U16.5

## Polygon pours and split planes (outlines as drawn)
no net on Power (split plane): 134.16,-1.649 130.914,-1.649 130.914,2.108 130.904,2.208 130.875,2.304 130.828,2.392 130.765,2.469 130.687,2.533 130.599,2.58 130.503,2.609 130.404,2.619 2.134,2.619 2.034,2.609 1.938,2.58 1.85,2.533 1.773,2.469 1.709,2.392 1.662,2.304 1.633,2.208 1.623,2.108 1.623,-1.649 -1.649,-1.649 -1.649,87.882 1.623,87.882 1.623,84.125 1.633,84.025 1.662,83.929 1.709,83.841 1.773,83.764 1.85,83.7 1.938,83.653 2.034,83.624 2.134,83.614 130.404,83.614 130.503,83.624 130.599,83.653 130.687,83.7 130.765,83.764 130.828,83.841 130.875,83.929 130.904,84.025 130.914,84.125 130.914,87.882 134.16,87.882
GND on GND (split plane): 134.16,-1.649 130.914,-1.649 130.914,2.108 130.904,2.208 130.875,2.304 130.828,2.392 130.765,2.469 130.687,2.533 130.599,2.58 130.503,2.609 130.404,2.619 2.134,2.619 2.034,2.609 1.938,2.58 1.85,2.533 1.773,2.469 1.709,2.392 1.662,2.304 1.633,2.208 1.623,2.108 1.623,-1.649 -1.649,-1.649 -1.649,87.882 1.623,87.882 1.623,84.125 1.633,84.025 1.662,83.929 1.709,83.841 1.773,83.764 1.85,83.7 1.938,83.653 2.034,83.624 2.134,83.614 130.404,83.614 130.503,83.624 130.599,83.653 130.687,83.7 130.765,83.764 130.828,83.841 130.875,83.929 130.904,84.025 130.914,84.125 130.914,87.882 134.16,87.882

## Silkscreen, mask and mechanical layers (free items; w line width, h text height)
Top Overlay:
  lines w0.203: 13.208,35.458 13.208,35.966 ; 13.208,38.43 13.208,37.998 ; 13.716,35.966 13.208,35.966 ; 13.716,37.998 13.208,37.998 ; 13.894,33.63 13.894,35.281 13.208,35.966 ; 13.894,39.268 13.894,38.684 13.208,37.998 ; 36.652,10.338 37.109,10.795 ; 80.315,18.415 81.102,19.202 ; 80.391,19.812 81.432,20.472 ; 83.591,29.108 83.871,28.829 86.182,28.829 ; 87.401,5.613 87.909,6.121 ; 87.401,7.595 87.909,7.595 ; 87.452,9.119 87.96,8.611 ; 87.478,6.96 87.935,6.96 ; 87.478,10.211 87.909,10.211 ; 127.108,78.137 127.108,78.556 ; 127.527,78.556 127.108,78.556 ; 128.092,76.454 128.092,77.572 127.108,78.556
  text "CAMERA-1" at 14.707,84.963 h1.52
  text "CAMERA-2" at 43.307,84.963 h1.52
  text "*" at 123.139,82.913 h1.02 r90
  text "*" at 125.324,82.88 h1.02 r90
  text "*" at 126.822,81.128 h1.02 r180
  text "*" at 127.864,79.756 h1.02 r180
  text "*" at 122.453,76.581 h1.02 r180
  text "*" at 99.695,69.418 h1.02 r90
  text "*" at 96.672,66.56 h1.02 r90
  text "-VE" at -0.457,61.493 h1.14
  text "BATT" at -0.737,58.09 h1.4 r90
  text "+VE" at -0.508,57.15 h1.14
  text "-VE" at -0.457,55.042 h1.14
  text "+VE" at -0.508,50.698 h1.14
  text "RTC-BATT" at -0.737,49.987 h1.4 r90
  text "*" at 5.466,46.558 h1.02 r90
  text "*" at 20.376,38.176 h1.02 r90
  text "B_CFG0" at 73.584,36.322 h1.52
  text "*" at 20.376,34.696 h1.02 r90
  text "B_CFG1" at 73.584,30.632 h1.52
  text "*" at 119.685,22.555 h1.02 r90
  text "*" at 118.897,22.327 h1.02 r180
  text "*" at 119.507,21.031 h1.02 r180
  text "*" at 119.532,19.99 h1.02 r180
  text "*" at 82.631,17.551 h1.02 r90
  text "*" at 99.365,13.284 h1.02 r90
  text "#" at 21.031,8.941 h0.64 r180
  text "#" at 21.689,8.941 h0.64 r180
  text "#" at 22.347,8.941 h0.64 r180
  text "#" at 23.005,8.941 h0.64 r180
  text "#" at 23.663,8.941 h0.64 r180
  text "#" at 24.321,8.941 h0.64 r180
  text "#" at 24.979,8.941 h0.64 r180
  text "#" at 25.637,8.941 h0.64 r180
  text "#" at 26.295,8.941 h0.64 r180
  text "#" at 26.953,8.941 h0.64 r180
  text "#" at 27.611,8.941 h0.64 r180
  text "#" at 28.269,8.941 h0.64 r180
  text "#" at 28.927,8.941 h0.64 r180
  text "#" at 29.585,8.941 h0.64 r180
  text "#" at 30.243,8.941 h0.64 r180
  text "#" at 30.901,8.941 h0.64 r180
  text "#" at 31.559,8.941 h0.64 r180
  text "#" at 32.217,8.941 h0.64 r180
  text "#" at 32.876,8.941 h0.64 r180
  text "#" at 33.534,8.941 h0.64 r180
  text "#" at 34.192,8.941 h0.64 r180
  text "#" at 34.85,8.941 h0.64 r180
  text "#" at 35.508,8.941 h0.64 r180
  text "#" at 36.166,8.941 h0.64 r180
  text "#" at 36.824,8.941 h0.64 r180
  text "#" at 37.482,8.941 h0.64 r180
  text "#" at 38.14,8.941 h0.64 r180
  text "#" at 38.798,8.941 h0.64 r180
  text "#" at 39.456,8.941 h0.64 r180
  text "#" at 40.114,8.941 h0.64 r180
  text "#" at 40.772,8.941 h0.64 r180
  text "#" at 41.43,8.941 h0.64 r180
  text "#" at 42.088,8.941 h0.64 r180
  text "*" at 89.103,4.521 h1.02 r90
  text "*" at 100.279,3.556 h1.02 r90
  text "*" at 100.279,2.591 h1.02 r90
  text "LCD" at 28.397,-0.305 h1.52
Bottom Overlay:
  drawing of 3079 lines, arcs and shapes, not listed
  text "Note:" at 11.049,81.763 h1.52
  text "* >> 0.1uF" at 10.439,79.405 h1.27
  text "# >> 22R" at 10.49,77.5 h1.27
  text "*" at -1.58,60.122 h1.02 r270
  text "BATTERY" at 7.29,57.404 h1.4 r90
  text "*" at 81.178,53.276 h1.02 r270
  text "ZERO CARBON FOOTPRINT" at 56.769,34.442 h0.97
  text "*" at 4.694,17.805 h1.02 r270
  text "#" at 31.928,6.985 h0.64 r180
  text "#" at 32.571,6.985 h0.64 r180
Mechanical 2:
  lines w0.254: 134.671,-2.159 130.404,-2.159 130.404,2.108 2.134,2.108 2.134,-2.159 -2.159,-2.159 -2.159,-2.134 -2.159,88.392 2.134,88.392 2.134,140.97 130.404,140.97 130.404,88.392 134.671,88.392 ; 148.209,0.889 148.209,91.44

## Dimensions
0,0 to 0,86.233 on Mechanical 1
0,0 to 132.537,0 on Mechanical 1